# Altium PCB 0.PCB1.PcbDoc (part 9 of 10)
Units mil, origin at the board's own origin, x right, y up, seen from the top; angles counter-clockwise.
Board outline 3897.64 x 3897.64 mil, 6 copper layers (Top Layer, Layer 1, Layer 3, Layer 4, Layer 2, Bottom Layer), stack 60.567 mil thick; 715 components, 563 nets, 2530 pads, 1442 vias.
Unrouted connection lines stored in the file: 6.
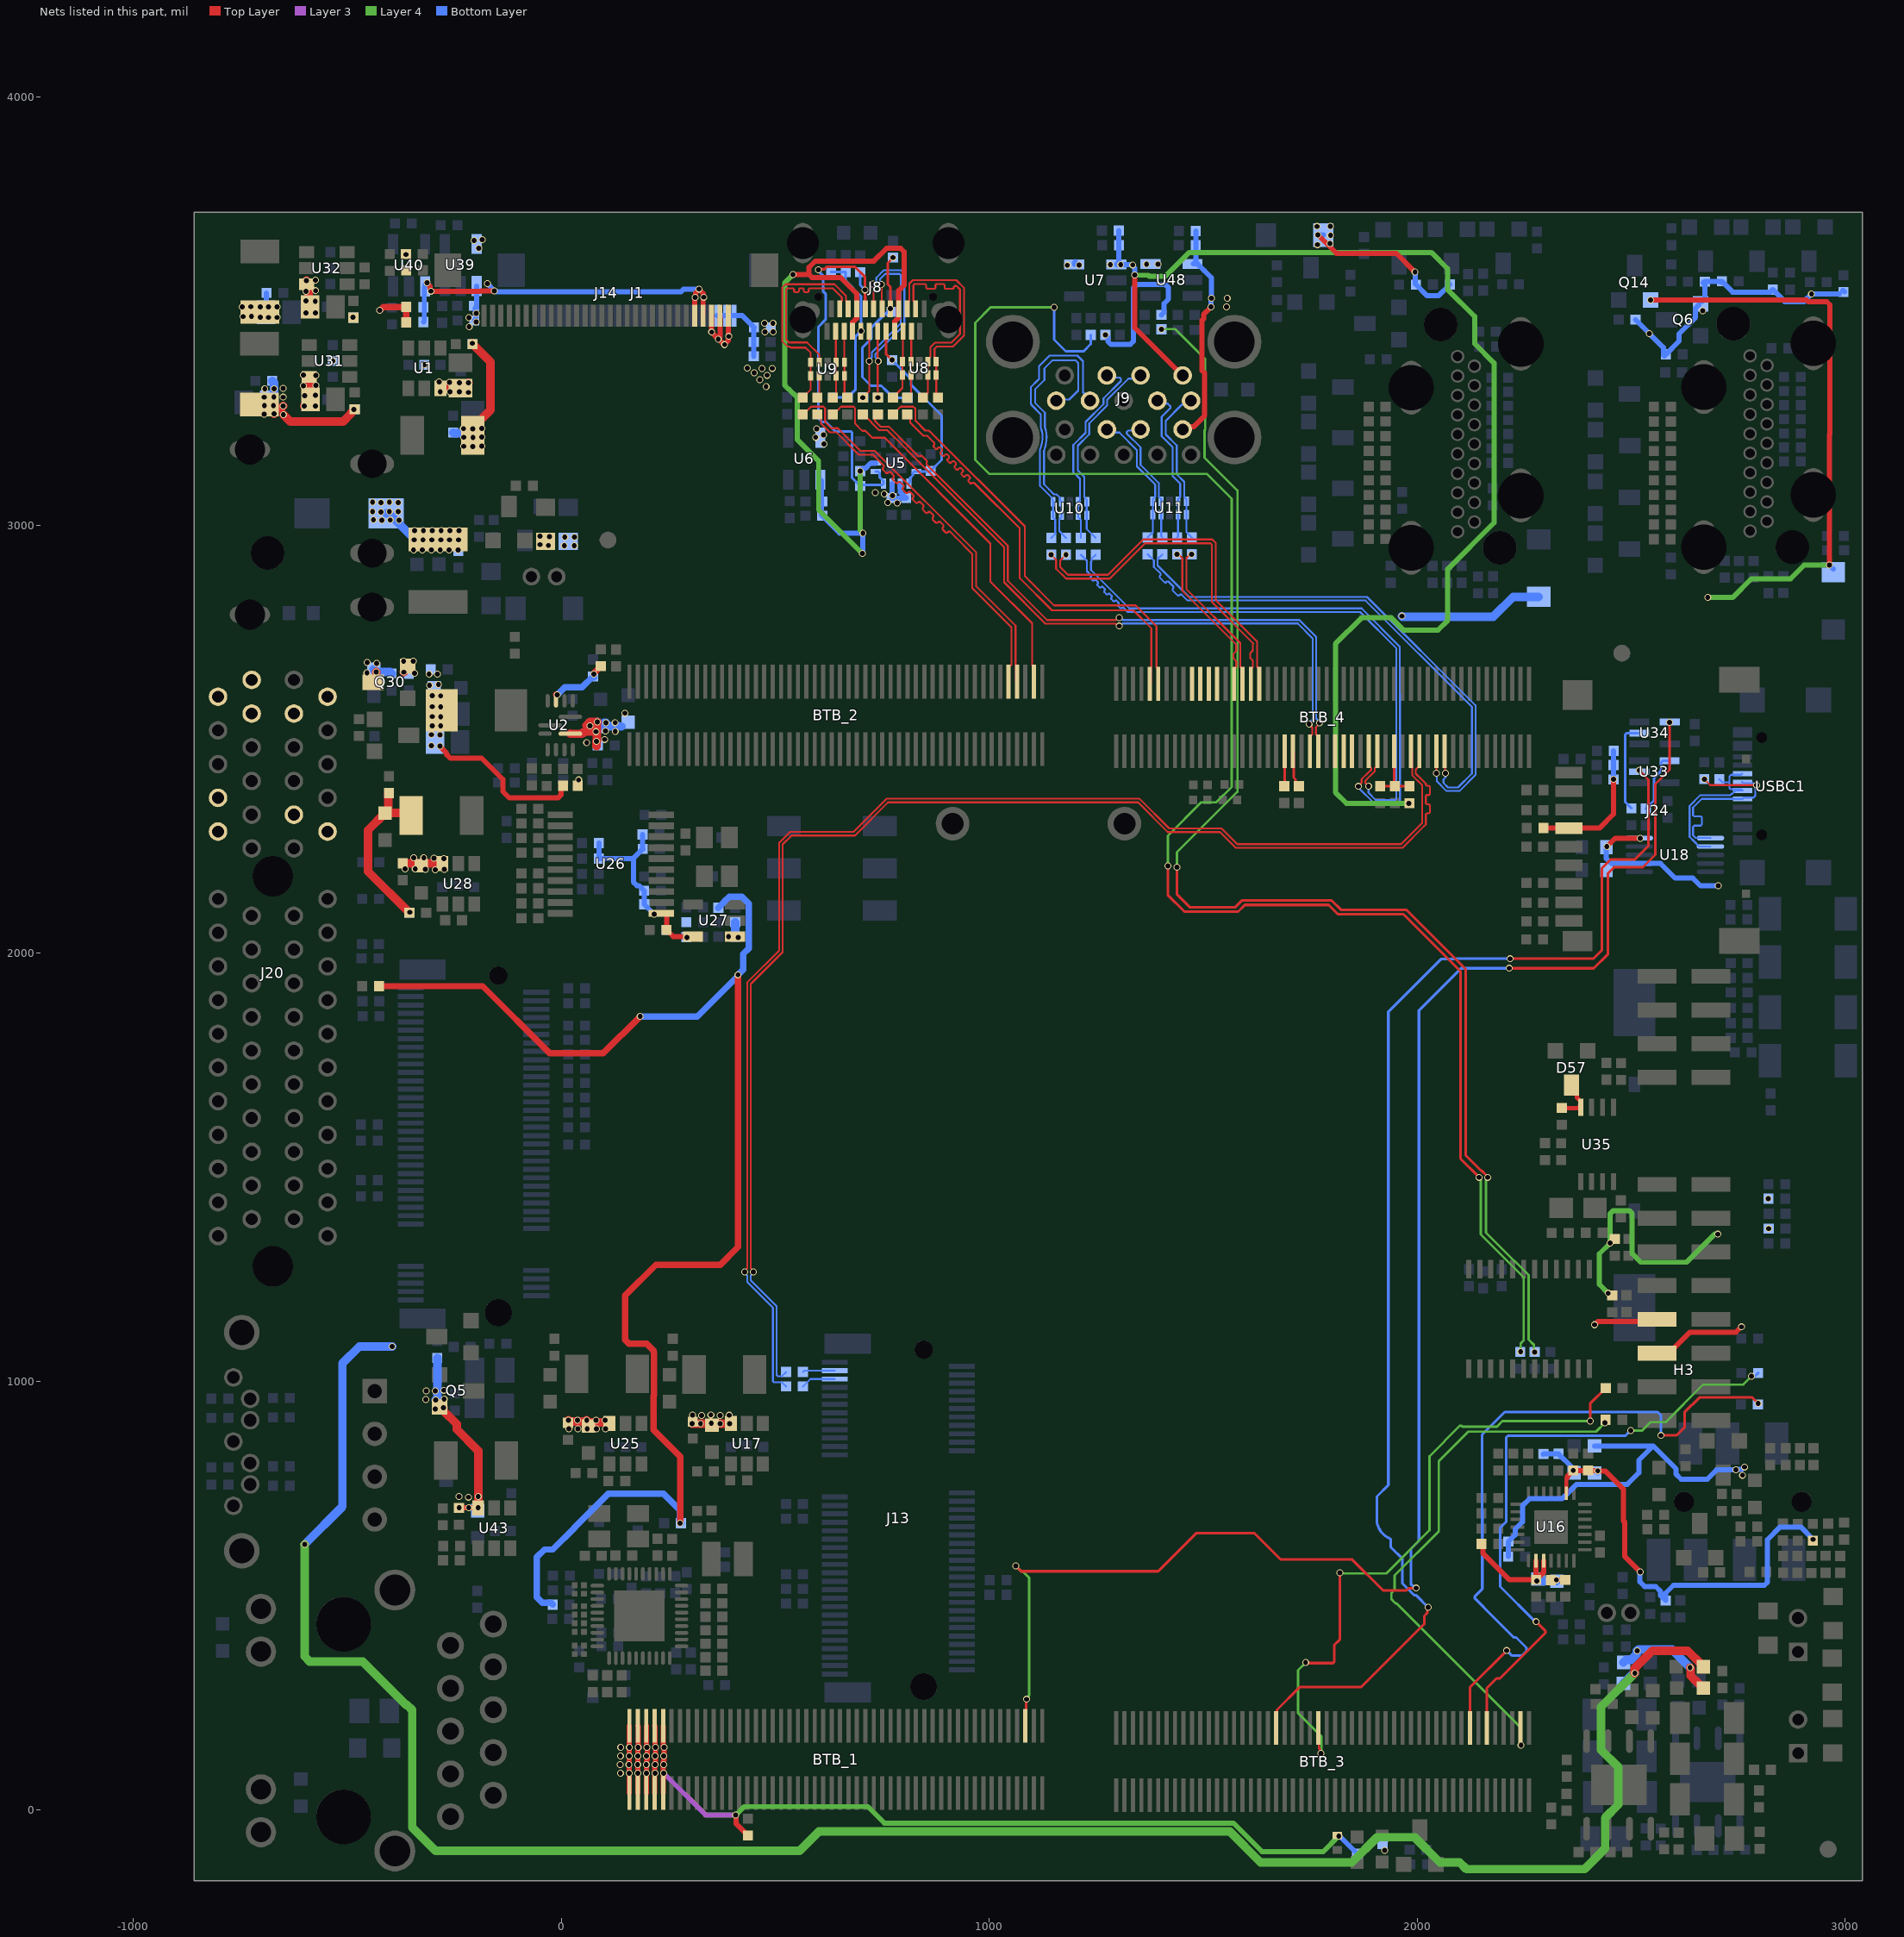
[diagram p12: the nets of this part, all layers, seen from the top]

## Via types
v1: diameter 16.14, hole 11.81, Top Layer to Bottom Layer, tented both sides, 1434 vias
v2: diameter 16.14, hole 11.81, Top Layer to Bottom Layer, 8 vias

## Nets (pads, with @x,y where several pads share a name; then routed paths per layer and width w, separated by ;. In a path a pad name is that pad's centre, name@x,y a point inside that pad or via, vN(x,y) a via of type N, cw(c..) or ccw(c..) an arc to the next point about the centre after c; other vN are vias at no path point) (continued)
TYPEC0_SSRX2P: BTB_2.49 R89.2 | length 893.8
  Top Layer w4.42: R89.2@634.57,3258.92 644.16,3268.51 645.71,3268.51 654.13,3276.93 682.87,3276.93 686.82,3272.98 686.82,3237.43 703.48,3220.77 710.6,3220.77 726.97,3204.4 755.92,3204.4 1002.9,2957.42 1002.9,2868.22 1100.25,2770.87 1100.25,2673.22 1104.37,2669.1 BTB_2.49@1104.37,2634.65
TYPEC0_SSTX1N: BTB_4.6 C80.2 | length 1056.1
  Top Layer w4.42: C80.2@775.1,3258.92 793.11,3276.93 822.77,3276.93 827.36,3272.34 827.36,3244.55 850.74,3221.16 859.51,3221.16 1083.22,2997.45 1083.22,2881.2 1151.5,2812.92 1341.96,2812.92 1390.76,2764.12 1390.76,2668.25 1394.91,2664.1 BTB_4.6@1394.91,2629.65
TYPEC0_SSTX1P: BTB_4.5 C79.2 | length 1062.1
  Top Layer w4.42: C79.2@808.4,3258.92 815.55,3251.77 815.55,3239.66 845.85,3209.35 854.62,3209.35 862.49,3201.49 872.12,3191.85 872.12,3188.19 870.45,3186.52 870.45,3183.29 875.3,3178.44 878.53,3178.44 882.1,3182.01 885.33,3182.01 890.18,3177.17 890.18,3173.94 886.6,3170.37 886.6,3167.14 891.45,3162.29 894.68,3162.29 898.25,3165.86 901.48,3165.86 906.33,3161.02 906.33,3157.79 902.75,3154.22 902.75,3150.99 907.6,3146.14 910.83,3146.14 914.4,3149.71 917.63,3149.71 922.48,3144.87 922.48,3141.64 918.91,3138.07 918.91,3134.84 923.75,3129.99 926.98,3129.99 930.55,3133.56 933.78,3133.56 938.63,3128.72 938.63,3125.49 935.06,3121.92 935.06,3118.69 939.9,3113.84 943.13,3113.84 946.7,3117.41 949.93,3117.41 954.78,3112.57 954.78,3109.34 951.21,3105.76 951.21,3102.53 956.05,3097.69 959.28,3097.69 960.95,3099.36 964.61,3099.36 968.61,3095.36 1071.41,2992.56 1071.41,2876.31 1146.61,2801.11 1337.07,2801.11 1378.96,2759.23 1378.96,2669.4 1377.94,2668.39 1377.94,2632.36 BTB_4.5@1375.23,2629.65
TYPEC0_SSTX2N: BTB_2.47 C83.2 | length 914.2
  Top Layer w4.42: C83.2@564.3,3258.92 573.89,3268.51 575.51,3268.51 584.03,3277.03 612.77,3277.03 616.56,3273.24 616.56,3241.38 631.15,3226.79 646.5,3226.79 699.28,3174.01 732.59,3174.01 969.82,2936.78 969.82,2857.3 1061.52,2765.6 1061.52,2674.4 1062.29,2673.64 1062.29,2637.36 BTB_2.47@1065,2634.65
TYPEC0_SSTX2P: BTB_2.46 C82.2 | length 920.7
  Top Layer w4.42: C82.2@598.4,3259.02 607.14,3250.28 607.14,3237.48 627.24,3217.37 642.6,3217.37 695.38,3164.59 728.69,3164.59 740.64,3152.64 753.81,3139.47 753.81,3135.81 751.49,3133.48 751.49,3130 759.62,3121.87 763.1,3121.87 765.51,3124.28 769,3124.28 777.13,3116.16 777.13,3112.67 774.71,3110.26 774.71,3106.78 782.84,3098.65 786.32,3098.65 788.74,3101.06 792.22,3101.06 800.35,3092.94 800.35,3089.45 797.93,3087.04 797.93,3083.55 806.06,3075.43 809.54,3075.43 811.96,3077.84 815.44,3077.84 823.57,3069.71 823.57,3066.23 821.15,3063.82 821.15,3060.33 829.28,3052.21 832.76,3052.21 835.18,3054.62 838.66,3054.62 846.79,3046.49 846.79,3043.01 844.37,3040.59 844.37,3037.11 852.5,3028.98 855.99,3028.98 858.4,3031.4 861.88,3031.4 870.01,3023.27 870.01,3019.79 867.6,3017.37 867.6,3013.89 875.72,3005.76 879.21,3005.76 881.62,3008.18 885.1,3008.18 893.23,3000.05 893.23,2996.57 890.82,2994.15 890.82,2990.67 898.94,2982.54 902.43,2982.54 904.75,2984.87 908.42,2984.87 920.56,2972.73 960.4,2932.88 960.4,2853.4 1052.1,2761.7 1052.1,2674.4 1049.52,2671.81 1048.03,2671.81 1045.32,2669.1 BTB_2.46@1045.32,2634.65
TYPEC0_USB20_OTG_DM: BTB_4.77 R82.2 | length 1593.8
  Top Layer w4.4: R82.2@704.83,3258.92 714.43,3249.32 716.21,3249.32 725.01,3240.52 725.01,3239.62 742.61,3222.02 761.84,3222.02 800.57,3183.3 800.57,3183.25 813.85,3169.97 813.9,3169.97 1035.05,2948.82 1035.05,2866.57 1131.42,2770.2 1295.45,2770.2 1301,2764.65 v1(1303.9,2764.65) ; v1(1747.4,2535.8) 1747.4,2534.84 1754.89,2527.35 1754.89,2511.92 1752.31,2509.34 1751.97,2509.34 1749.24,2506.62 BTB_4.77@1749.24,2472.17
  Bottom Layer w4.4: v1(1303.9,2764.65) 1306.61,2764.65 1312.35,2770.39 1721.21,2770.39 1755.65,2735.95 1755.65,2547.23 1747.4,2538.98 v1(1747.4,2535.8)
TYPEC0_USB20_OTG_DP: BTB_4.76 R81.2 | length 1594.3
  Top Layer w4.4: R81.2@739.97,3258.92 733.41,3252.37 733.41,3243.1 746.09,3230.42 765.32,3230.42 808.97,3186.78 808.97,3186.73 817.33,3178.37 817.38,3178.37 820.32,3175.42 834.86,3160.89 838.5,3160.89 839.68,3162.07 842.71,3162.07 854.82,3149.96 854.82,3146.94 853.64,3145.76 853.64,3142.11 870.32,3125.42 1043.45,2952.3 1043.45,2870.05 1134.9,2778.6 1295.32,2778.6 1301.06,2784.34 v1(1303.77,2784.34) ; BTB_4.76@1768.93,2472.17 1768.93,2506.62 1766.21,2509.34 1765.86,2509.34 1763.29,2511.92 1763.29,2528.33 1771.54,2536.59 v1(1771.54,2538)
  Bottom Layer w4.4: v1(1303.77,2784.34) 1306.67,2784.34 1312.22,2778.79 1724.69,2778.79 1764.05,2739.43 1764.05,2548.67 1771.54,2541.18 v1(1771.54,2538)
TYPEC0_USB20_OTG_ID: BTB_4.79 R78.2 | length 87.5
  Top Layer w6.16: BTB_4.79@1709.87,2472.17 1711.72,2470.33 1711.72,2410.75 1715.71,2406.76 1715.71,2398.34 R78.2@1723.67,2390.38
TYPEC0_USB20_VBUSDET: BTB_4.80 R77.2 | length 81.8
  Top Layer w6.16: R77.2@1689.57,2390.66 1690.19,2391.28 BTB_4.80@1690.19,2472.17
TYPEC1_SBU1: BTB_4.72
TYPEC1_SBU2: BTB_4.73
TYPEC1_SSRX1N: BTB_4.18 R83.2 | length 814.7
  Top Layer w4.42: v1(1179.35,2931.38) 1165.8,2917.83 1165.8,2902.5 1183.78,2884.52 1277.8,2884.52 1360.38,2967.1 1521.41,2967.1 1529.52,2958.99 1529.52,2824.68 1626,2728.2 1626,2669.23 1631.13,2664.1 BTB_4.18@1631.13,2629.65
TYPEC1_SSRX1P: BTB_4.17 R84.2 | length 816.3
  Top Layer w4.42: v1(1144.85,2931.38) 1156.38,2919.85 1156.38,2898.6 1179.88,2875.1 1281.7,2875.1 1364.28,2957.68 1517.51,2957.68 1520.1,2955.09 1520.1,2820.78 1616.58,2724.3 ; BTB_4.17@1611.45,2629.65 BTB_4.17@1611.45,2664.1 ; BTB_4.17@1613.4,2666 1613.4,2666.05 1616.01,2668.66 1616.01,2669.91 ; 1615.9,2669.8 1616.01,2669.91 ; 1616.4,2724.2 1616.01,2723.81 1616.01,2707.49 1609.7,2701.18 1609.7,2690.12 1616.01,2683.81 1616.01,2669.91
TYPEC1_SSRX2N: BTB_4.13
TYPEC1_SSRX2P: BTB_4.12
TYPEC1_SSTX1N: BTB_4.15 C75.2 | length 369.7
  Top Layer w4.42: v1(1438.7,2932.4) 1441.87,2932.4 1451.18,2923.09 1451.18,2847.02 1577.21,2720.99 1577.21,2706.19 1570.9,2699.88 1570.9,2688.82 1577.21,2682.51 1577.21,2669.24 1572.08,2664.1 BTB_4.15@1572.08,2629.65
  Bottom Layer w4.42: v1(1438.7,2932.4) 1438.92,2932.4 C75.2@1439.05,2932.27
TYPEC1_SSTX1P: BTB_4.16 C76.2 | length 364.1
  Top Layer w4.42: v1(1473.08,2932.4) 1469.9,2932.4 1460.6,2923.09 1460.6,2850.92 1586.63,2724.89 1586.63,2669.24 1591.76,2664.1 BTB_4.16@1591.76,2629.65
TYPEC1_SSTX2N: BTB_4.10
TYPEC1_SSTX2P: BTB_4.11
TYPEC1_USB20_OTG_DM: BTB_4.70 R79.2 | length 1412
  Top Layer w4.4: v1(1862.7,2390) 1862.7,2390.89 1870.26,2398.45 1870.26,2406.79 1887.04,2423.56 1887.42,2423.56 1892.63,2428.78 1892.63,2432.43 1890.05,2435 1889.76,2435 1887.04,2437.72 BTB_4.70@1887.04,2472.17
  Bottom Layer w4.4: R79.2@1248.7,2931.25 1239.1,2921.65 1239.1,2915.7 1238.02,2914.63 1238.02,2895.18 1327.5,2805.7 1869.98,2805.7 1959.3,2716.38 1959.3,2606.21 1959.87,2605.63 1959.87,2356.85 1952.03,2349.01 1911.25,2349.01 1910.68,2349.59 1900.13,2349.59 1862.7,2387.02 v1(1862.7,2390)
TYPEC1_USB20_OTG_DP: BTB_4.69 R80.2 | length 1418.2
  Top Layer w4.4: v1(1886.3,2390.2) 1886.3,2391.01 1878.66,2398.65 1878.66,2403.31 1890.52,2415.16 1890.89,2415.16 1901.03,2425.3 1901.03,2432.38 1903.66,2435 1904,2435 1906.72,2437.72 BTB_4.69@1906.72,2472.17
  Bottom Layer w4.4: R80.2@1214.2,2931.25 1228.3,2917.15 1228.3,2898.4 1228.3,2893.02 1237.8,2883.52 1237.8,2879.87 1236.55,2878.61 1236.55,2876.19 1242.19,2870.55 1244.61,2870.55 1246.48,2872.42 1248.9,2872.42 1254.54,2866.78 1254.54,2864.36 1252.67,2862.49 1252.67,2860.07 1258.31,2854.43 1260.73,2854.43 1262.6,2856.3 1265.02,2856.3 1270.66,2850.66 1270.66,2848.24 1268.79,2846.37 1268.79,2843.95 1274.43,2838.31 1276.85,2838.31 1278.72,2840.18 1281.14,2840.18 1286.78,2834.54 1286.78,2832.12 1284.91,2830.25 1284.91,2827.83 1290.55,2822.18 1292.97,2822.18 1294.84,2824.06 1297.26,2824.06 1302.91,2818.41 1302.91,2816 1301.03,2814.12 1301.03,2811.71 1306.68,2806.06 1309.09,2806.06 1310.35,2807.32 1314,2807.32 1317.44,2803.88 1324.02,2797.3 1866.5,2797.3 1950.9,2712.9 1950.9,2360.56 1948.32,2357.99 1903.61,2357.99 1886.3,2375.3 v1(1886.3,2390.2)
TYPEC1_USB20_OTG_ID: BTB_4.74
TYPEC1_USB20_VBUSDET: BTB_4.67 C253.1 R149.1 R150.2 | length 150.2
  Top Layer w6.16: C253.1@1913.6,2390.28 R150.2@1981.9,2390.3 ; R149.1@1946.09,2390.67 BTB_4.67@1946.09,2472.17 ; R149.1@1947.7,2390.38 R149.1@1947.99,2390.67
TYPEC_CC1: C78.1 D10.2 J8.A5 U5.10 U5.11 | length 462.9
  Top Layer w6.16: J8.A5@759.21,3453.02 759.21,3399.89 v1(773.1,3386)
  Bottom Layer w6.16: v1(773.1,3386) 817.18,3341.92 817.18,3328.07 888.9,3256.35 888.9,3152.74 C78.1@863.06,3126.9 861.47,3125.32 U5.10@830.3,3125.32 824.39,3125.32 821.57,3122.49 821.57,3116.58 815.01,3110.03 815.01,3100.19 U5.11@812.19,3097.36
TYPEC_CC2: C77.1 D11.2 J8.B5 U5.1 U5.14 | length 924.4
  Top Layer w6.16: v1(600.8,3596.57) 602.44,3598.21 614.93,3598.21 620.84,3604.12 685.7,3604.12 710,3579.82 v1(710,3549.8) 710.2,3549.6 710.2,3505.97 J8.B5@710.39,3505.77
  Bottom Layer w6.16: v1(600.8,3596.57) 600.8,3593.93 611.72,3583.01 611.72,3546.88 617.86,3540.74 617.86,3480.16 601.14,3463.44 601.14,3249.46 609,3241.6 618.28,3241.6 640.34,3219.54 676.27,3219.54 679.88,3215.93 679.88,3110.38 C77.1@698.76,3091.5 701.59,3094.33 750.31,3094.33 753.13,3097.15 753.13,3103.27 743.75,3112.65 743.75,3122.49 740.93,3125.32 U5.1@735.02,3125.32 ; D11.2@698.7,3591.12 698.7,3561.1 v1(710,3549.8)
TYPEC_DM: D9.2 J8.A7 J8.B7 R82.1 | length 518.9
  Top Layer w4.4: v1(704.83,3298.28) 719.9,3313.35 v1(719.9,3383.15) 719.9,3452.96 J8.A7@719.84,3453.02 ; v1(747.91,3562.4) 748.83,3561.48 748.83,3506.7 J8.B7@749.76,3505.77
  Bottom Layer w4.4: v1(719.9,3383.15) 719.9,3385.72 725.78,3391.6 725.78,3403.76 793.5,3471.48 793.5,3584.62 790.92,3587.19 757.17,3587.19 744.84,3574.87 744.84,3570.95 745.66,3570.13 745.66,3564.65 v1(747.91,3562.4)
TYPEC_DP: D8.2 J8.A6 J8.B6 R81.1 | length 542
  Top Layer w4.4: v1(728.25,3563.37) 729.89,3561.73 729.89,3505.96 J8.B6@730.08,3505.77 ; v1@739.52,3384.53 J8.A6@739.52,3453.02 ; v1(739.97,3298.28) 739.97,3315.6 739.52,3316.04 739.52,3382.59 v1(740.5,3383.57)
  Bottom Layer w4.4: v1(728.25,3563.37) 728.25,3563.55 736.44,3571.75 736.44,3578.35 753.69,3595.59 794.4,3595.59 801.9,3588.09 801.9,3468 734.18,3400.28 734.18,3392.02 740.5,3385.7 v1(740.5,3383.57)
TYPEC_SSRXN1: J8.B10 R86.1 U8.5 U8.6 | length 509.8
  Top Layer w4.42: J8.B10@808.42,3505.77 808.42,3519.55 813.52,3524.66 813.52,3564.59 821.63,3572.7 923.02,3572.7 941.1,3554.62 941.1,3442.84 915.54,3417.28 877.53,3417.28 872.33,3412.08 872.33,3393.6 872.54,3393.39 872.54,3386.09 U8.6@876.24,3382.4 U8.5@876.24,3350.9 876.24,3302.54 R86.1@880.5,3298.28
TYPEC_SSRXN2: J8.A10 R91.1 U9.5 U9.6 | length 158.3
  Top Layer w4.42: J8.A10@661.18,3453.02 661.54,3452.66 661.54,3380.86 U9.6@661.9,3380.5 U9.5@661.9,3349 661.9,3306.08 R91.1@669.7,3298.28
TYPEC_SSRXP1: J8.B11 R85.1 U8.4 U8.7 | length 510.3
  Top Layer w4.42: J8.B11@828.11,3505.77 828.11,3519.55 822.94,3524.72 822.94,3560.69 825.53,3563.28 826.72,3563.28 850.35,3563.28 852.94,3560.69 852.94,3554.32 855.08,3552.18 872.22,3552.18 874.36,3554.32 874.36,3561.14 876.5,3563.28 893.64,3563.28 895.78,3561.14 895.78,3554.32 897.92,3552.18 915.06,3552.18 917.2,3554.32 917.2,3556.36 919.79,3558.95 923.45,3558.95 929.08,3553.32 931.68,3550.72 931.68,3446.74 911.64,3426.7 873.63,3426.7 862.91,3415.98 862.91,3393.6 860.32,3391.01 860.25,3391.01 856.56,3387.32 U8.4@856.56,3350.9 856.56,3309.47 R85.1@845.37,3298.28
TYPEC_SSRXP2: J8.A11 R89.1 U9.4 U9.7 | length 158.2
  Top Layer w4.42: R89.1@634.57,3298.28 642.22,3305.93 U9.4@642.22,3349 U9.7@642.22,3380.5 641.86,3380.86 641.86,3452.65 J8.A11@641.49,3453.02
TYPEC_SSTXN1: C80.1 J8.A3 U8.1 U8.10 | length 164.6
  Top Layer w4.42: C80.1@775.1,3298.28 797.5,3320.68 U8.1@797.5,3350.9 U8.10@797.5,3382.4 798.24,3383.14 798.24,3452.28 J8.A3@798.97,3453.02
TYPEC_SSTXN2: C83.1 J8.B3 U9.1 U9.10 | length 511.7
  Top Layer w4.42: C83.1@564.3,3298.28 583.16,3317.14 U9.1@583.16,3349 U9.10@583.16,3380.5 583.16,3402.74 570.9,3415 536.4,3415 534.03,3417.37 528.73,3417.37 516.18,3429.92 516.18,3554.91 524.29,3563.02 638.47,3563.02 665.49,3535.99 665.49,3524.69 670.63,3519.55 J8.B3@670.63,3505.77
TYPEC_SSTXP1: C79.1 J8.A2 U8.2 U8.9 | length 158.2
  Top Layer w4.42: C79.1@810.23,3298.28 817.18,3305.23 U8.2@817.18,3350.9 U8.9@817.18,3382.4 817.92,3383.14 817.92,3452.28 J8.A2@818.66,3453.02
TYPEC_SSTXP2: C82.1 J8.B2 U9.2 U9.9 | length 505.6
  Top Layer w4.42: C82.1@599.43,3298.28 602.84,3301.69 U9.2@602.84,3349 U9.9@602.84,3380.5 602.84,3398.56 574.5,3426.9 536.4,3426.9 536.29,3426.79 532.63,3426.79 525.6,3433.82 525.6,3551.01 527.92,3553.33 528.19,3553.6 541.55,3553.6 544.14,3551.01 544.14,3546.66 546.42,3544.37 553.28,3544.37 555.56,3546.66 555.56,3551.32 557.84,3553.6 564.7,3553.6 566.98,3551.32 566.98,3546.66 569.26,3544.37 576.12,3544.37 578.4,3546.66 578.4,3551.01 580.99,3553.6 604.5,3553.6 634.56,3553.6 656.07,3532.09 656.07,3524.69 650.94,3519.55 J8.B2@650.94,3505.77
TYPEC_SUB1: C84.1 D12.2 J8.A8 R92.1 R97.1 | length 391.5
  Top Layer w6.16: J8.A8@700.15,3453.02 700.64,3453.5 v1(700.8,3453.5)
  Bottom Layer w6.16: D12.2@630.6,3592.1 631.08,3591.62 R97.1@664.8,3591.62 664.8,3571.4 700.8,3535.4 v1(700.8,3453.5) 687.4,3440.1 687.4,3315.98 C84.1@669.7,3298.28 R92.1@634.57,3298.28
TYPEC_SUB2: C85.1 D13.2 J8.B8 R94.1 R98.1 | length 440.3
  Top Layer w6.16: v1(769.05,3505.77) 769.05,3556.92 763.05,3562.92 763.05,3612.99 775.2,3625.14 v1(775.2,3625.32)
  Bottom Layer w6.16: v1(769.05,3505.77) 724.4,3461.12 724.4,3435.5 703.7,3414.8 703.7,3346 723.79,3325.91 748.11,3325.91 758.6,3315.42 758.6,3315.1 C85.1@775.6,3298.1 809.58,3298.1 R94.1@809.9,3297.78
UART2_D+: D24.2 U18.1 USBC1.A6 USBC1.B6 | length 486.4
  Top Layer w4.4: v1(2671.16,2406.52) 2684.77,2392.91 v1(2793,2392.91)
  Bottom Layer w4.4: U18.1@2685.16,2269.21 2684.9,2269.47 2650.71,2269.47 2647.88,2272.3 2644.61,2275.57 2644.61,2295.9 2647.18,2298.48 2662.63,2298.48 2664.77,2300.62 2664.77,2317.74 2662.63,2319.88 2647.18,2319.88 2644.61,2322.46 2644.61,2325.9 2644.61,2340.54 2664.86,2360.79 USBC1.B6@2760.21,2360.79 ; USBC1.B6@2759.4,2360.82 2762.22,2363.64 2785.98,2363.64 2787.16,2364.82 2787.16,2365.42 2790.06,2368.32 2790.06,2392.22 2784.91,2397.36 2762.22,2397.36 USBC1.A6@2759.4,2400.19
UART2_D-: D25.2 U18.2 USBC1.A7 USBC1.B7 | length 387.9
  Bottom Layer w4.4: U18.2@2685.16,2249.52 2658.78,2249.52 2646.86,2261.44 2636.2,2272.09 2636.2,2344.02 2661.78,2369.6 2731.7,2369.6 2735,2372.9 2735.89,2372.9 2743.47,2380.48 USBC1.A7@2760.21,2380.48 ; D25.2@2705.96,2406.56 2713.04,2399.48 2729.68,2399.48 ; USBC1.A7@2759.4,2380.5 2756.57,2383.33 2732.05,2383.33 2729.68,2385.7 2729.68,2399.48 ; USBC1.B7@2759.4,2419.87 2756.57,2417.05 2733.47,2417.05 2729.68,2413.26 2729.68,2399.48
UART2_RX: R291.2 U34.2 | length 214.3
  Bottom Layer w6.16: R291.2@2500.66,2338.88 2485.86,2353.68 2485.86,2511 2489.47,2514.61 U34.2@2520.43,2514.61
UART2_RX_M0_DEBUG: BTB_1.48 U34.4 | length 3903.2
  Top Layer w6.16: v1(1062.2,569) 1074.7,556.5 1394.8,556.5 1484.3,646 1619,646 1680.5,584.5 1847.3,584.5 1920.3,511.5 1974.6,511.5 1980.22,517.12 1997.34,517.12 v1(1997.53,517.32) ; BTB_1.48@1086.1,221.5 1086.01,221.59 1086.01,256.21 v1(1087.34,257.54) ; v1(2215.2,1965.1) 2412.5,1965.1 2445.8,1998.4 2445.8,2186.9 2460,2201.1 2527,2201.1 2556.2,2230.3 2556.2,2395.4 2589.5,2428.7 v1(2589.5,2539.7)
  Layer 4 w6.16: v1(1062.2,569) 1074.93,556.27 1078.31,556.27 1093.78,540.79 1093.78,266.59 1087.34,260.14 v1(1087.34,257.54)
  Bottom Layer w6.16: v1(1997.53,517.32) 1994.83,517.32 1986.85,525.3 1985.3,525.3 1985.3,608.8 2004.1,627.6 2004.1,1866.4 2102.8,1965.1 v1(2215.2,1965.1) ; v1(2589.5,2539.7) 2589.96,2540.16 U34.4@2589.96,2540.32
UART2_TX: R290.2 U33.4 | length 143.5
  Bottom Layer w6.16: R290.2@2534.26,2338.28 2553.16,2357.18 2553.16,2409.22 2569.04,2425.1 2569.04,2444.9 2573.96,2449.82 U33.4@2589.46,2449.82
UART2_TX_M0_DEBUG: BTB_3.20 U33.2 | length 3026.2
  Top Layer w6.16: BTB_3.20@1670.5,200.5 1672.35,202.34 1672.35,232.65 1725.4,285.7 1751.4,285.7 ; 1751.4,286.5 1869.79,286.5 2016.8,433.51 2016.8,452.31 2023.47,458.98 2023.47,470.41 v1(2025.38,472.32) ; v1(2217,1987.3) 2411.5,1987.3 2431.2,2007 2431.2,2198.1 2452.4,2219.3 2508.8,2219.3 2540.3,2250.8 2540.3,2405.7 v1(2518.7,2427.3)
  Bottom Layer w6.16: v1(2025.38,472.32) 1996.72,500.98 1992.45,500.98 1965.7,527.73 1965.7,585.6 1940.3,611 1938.5,612.8 1938.5,630.97 1935.83,633.64 1933.17,634.74 1932.24,634.87 1931.23,635.55 1930.57,635.82 1930.07,636.32 1927.01,638.36 1924.88,639.26 1914.97,649.17 1914.97,649.95 1912.03,654.36 1911.53,654.86 1910.45,656.73 1910.45,657.46 1908.41,662.39 1907.89,662.91 1907.33,664.99 1907.33,665.7 1906.3,670.9 1905.74,671.45 1905.74,731.04 1932.63,757.93 1932.63,1863.33 2056.3,1987 2088.4,1987 ; 2088.4,1987.3 v1(2217,1987.3) ; U33.2@2518.6,2424.23 2518.6,2427.2 v1(2518.7,2427.3)
UART4_RX_M2: BTB_3.45 R197.1 | length 1420.4
  Top Layer w6.16: BTB_3.45@2162.63,211.97 2162.63,283.43 2185.7,306.5 2193.7,306.5 2299.35,412.15 2299.35,417.25 v1(2277.87,438.73)
  Layer 4 w5.61: v1(2498.7,885.5) 2525.7,885.5 2545,904.8 2580.2,904.8 2668,992.6 2761.84,992.6 v1(2781.19,1011.95)
  Bottom Layer w6.16: v1(2277.87,438.73) 2275.77,438.73 2193.84,520.66 2193.84,616.23 2194.14,616.53 2194.14,658.74 2208.3,672.9 2208.3,869.49 2211.91,873.1 2486.3,873.1 v1(2498.7,885.5) ; v1(2781.19,1011.95) 2788.83,1011.95 R197.1@2796.68,1019.8
UART4_TX_M2: BTB_3.43 R195.1 | length 1624
  Top Layer w6.16: BTB_3.43@2123.26,190.65 2123.26,285.39 v1(2209.19,371.31) ; v1@2210.95,369.55 v1@2215.3,373.9 ; v1(2569.7,873.7) 2605.8,873.7 2624.5,892.4 2624.5,927.8 2659.23,962.53 2782.77,962.53 v1(2796.5,948.8)
  Bottom Layer w6.16: v1(2209.19,371.31) 2209.74,371.31 2221.7,359.35 2244.14,359.35 2255.3,370.51 2255.3,377.91 2231.21,402 2225.5,402 2178.8,448.7 2134.65,492.85 2134.65,497.95 2152.05,515.35 2152.05,698.95 2151.63,699.37 2151.63,875.53 2204.7,928.6 2561.6,928.6 2569.7,920.5 v1(2569.7,873.7)
UART7_RX_M2: BTB_3.25 R198.2 | length 1503.7
  Top Layer w5.61: BTB_3.25@1768,179.1 1770.48,176.62 1770.48,142.87 1773.31,140.04 1773.31,133.12 v1(1775.32,131.1)
  Top Layer w6.16: v1(1739.28,343.18) 1740.46,342 1803.56,342 1805.9,344.34 1805.9,383.8 1819.6,397.5 v1(1819.6,552.8) ; v1(2404,907.1) 2404,947.88 R198.2@2440.52,984.4
  Layer 4 w4: v1(1819.6,552.8) 1820.2,552.2 v1@1820.2,551.4
  Layer 4 w5.61: v1(1739.28,343.18) 1739.28,342.89 1721.89,325.49 1721.89,225.31 1776.59,170.61 1776.59,132.37 v1(1775.32,131.1) ; v1@1820.2,551.4 1927.7,551.4 2028.6,652.3 2028.6,825.1 2099.58,896.08 2103.72,896.08 2105.6,894.2 2186.3,894.2 2199.2,907.1 v1(2404,907.1)
UART7_TX_M2: BTB_3.49 R196.2 | length 1269
  Top Layer w6.16: v1(2438.4,903.2) 2438.4,908.48 R196.2@2440.22,910.3
  Layer 4 w5.61: v1(2242.6,150.5) 2242.6,190.5 1951.7,481.4 1949.4,481.4 1939.6,491.2 1939.6,505.85 1947.4,513.65 1947.4,546.8 2050.5,649.9 2050.5,814 2119.3,882.8 2418,882.8 v1(2438.4,903.2)
USB20_DM1: J9.11 R88.1 U11.2 U11.9 | length 308.7
  Bottom Layer w4.4: J9.11@1347,3224.2 1344.15,3221.35 1325.05,3221.35 1321.57,3217.87 1321.57,3214.23 1353.63,3182.17 1353.63,3141.18 1396.18,3098.63 1396.18,3066.69 1401.82,3061.05 U11.2@1401.82,3056.13 U11.9@1401.82,3024.63 1401.82,2974.48 R88.1@1404.68,2971.63
USB20_DP1: J9.12 R90.1 U11.1 U11.10 | length 319.2
  Bottom Layer w4.4: J9.12@1274.82,3223.93 1282.27,3216.48 1304.32,3216.48 1345.23,3175.58 1345.23,3137.71 1387.78,3095.15 1387.78,3066.69 1382.14,3061.05 U11.1@1382.14,3056.13 U11.10@1382.14,3024.63 1382.14,2983.47 R90.1@1370.3,2971.63
USB20_HOST0_DM: BTB_4.62 R88.2 | length 1257.6
  Top Layer w4.4: BTB_4.62@2044.52,2472.17 2044.84,2471.85 2044.84,2421.04 v1(2045.16,2420.72)
  Bottom Layer w4.4: R88.2@1404.68,2932.27 1393.4,2920.99 1393.4,2906 1466.88,2832.52 1882.76,2832.52 2136.2,2579.08 2136.2,2416.72 2098.68,2379.2 2068.6,2379.2 2045.8,2402 2045.8,2420.08 v1(2045.16,2420.72)
USB20_HOST0_DP: BTB_4.61 R90.2 | length 1251.7
  Top Layer w4.4: BTB_4.61@2064.2,2472.17 2064.93,2471.45 2064.93,2421.44 v1(2065.65,2420.72)
  Bottom Layer w4.4: R90.2@1370.3,2932.27 1385,2917.57 1385,2910.51 1385,2902.52 1400.27,2887.25 1400.27,2883.61 1398.13,2881.46 1398.13,2878.44 1410.24,2866.33 1413.26,2866.33 1415.71,2868.78 1418.74,2868.78 1430.84,2856.68 1430.84,2853.65 1428.39,2851.2 1428.39,2848.17 1440.5,2836.07 1443.53,2836.07 1445.67,2838.21 1449.31,2838.21 1463.4,2824.12 1465.69,2824.12 1879.28,2824.12 2127.8,2575.6 2127.8,2420.2 2095.2,2387.6 2072.08,2387.6 2061.35,2398.33 2061.35,2406.27 2067.1,2412.02 2067.1,2419.27 v1(2065.65,2420.72)
USB20_HOST1_DM: BTB_4.65 R143.1 | length 3142.3
  Top Layer w4.4: v1(428.72,1255.8) 428.72,1258.36 434.61,1264.25 434.61,1931.71 509.22,2006.32 509.22,2257.92 535,2283.7 682.92,2283.7 760.22,2361 1351.4,2361 1420.7,2291.7 1543,2291.7 1579.8,2254.9 1962.1,2254.9 2011.71,2304.51 2011.71,2392.85 1988.19,2416.38 1988.19,2469.45 BTB_4.65@1985.46,2472.17
  Bottom Layer w4.4: v1(428.72,1255.8) 428.72,1253.24 434.61,1247.35 434.61,1232.6 494.9,1172.31 494.9,1000.33 497.48,997.75 516.01,997.75 R143.1@525.61,988.15
USB20_HOST1_DM_R: J13.5 R143.2 | length 81.4
  Bottom Layer w4.4: R143.2@564.97,988.15 582.35,1005.53 J13.5@639.2,1005.53
USB20_HOST1_DP: BTB_4.64 R142.1 | length 3148.9
  Top Layer w4.4: v1(448.9,1255.8) 448.9,1258.36 443.01,1264.25 443.01,1928.23 517.62,2002.84 517.62,2254.44 538.48,2275.3 686.4,2275.3 763.7,2352.6 1347.92,2352.6 1417.22,2283.3 1539.52,2283.3 1576.32,2246.5 1965.58,2246.5 2016.3,2297.22 2020.12,2301.04 2020.12,2324.47 2022.69,2327.05 2027.4,2327.05 2029.54,2329.19 2029.54,2346.31 2027.4,2348.45 2022.25,2348.45 2020.12,2350.59 2020.12,2367.71 2022.25,2369.85 2027.4,2369.85 2029.54,2371.99 2029.54,2389.11 2027.4,2391.25 2022.69,2391.25 2020.12,2393.83 2020.12,2396.33 2009.98,2406.46 1996.59,2419.86 1996.59,2429.16 2005.15,2437.72 BTB_4.64@2005.15,2472.17
  Bottom Layer w4.4: v1(448.9,1255.8) 448.9,1253.24 443.01,1247.35 443.01,1236.08 503.3,1175.79 503.3,1014.93 505.88,1012.35 516.01,1012.35 R142.1@525.61,1021.95
USB20_HOST1_DP_R: J13.3 R142.2 | length 75.6
  Bottom Layer w4.4: R142.2@564.97,1021.95 568.23,1025.21 J13.3@639.2,1025.21
USB20_HOST_PWR_EN: R39.2 R324.1 | length 3198.4
  Top Layer w6.16: v1(1439,2201.2) 1439,2137.1 1468.31,2107.79 1575.01,2107.79 1590.49,2123.26 1800.11,2123.26 1821.61,2101.76 1974.51,2101.76 2113.4,1962.87 2113.4,1527.84 2149.39,1491.85 2151.13,1491.85 2164.54,1478.44 v1(2164.54,1476.7)
  Layer 4 w5.61: v1(1402.68,3457.96) 1402.92,3458.2 1434.6,3458.2 1504.7,3388.1 1504.7,3223.4 1503.12,3221.82 1503.12,3157.88 1580.01,3080.99 1580.01,2377.41 1439,2236.4 v1(1439,2201.2) ; v1(2164.54,1476.7) 2160.7,1472.86 2160.7,1347.16 2226.78,1281.09 2228.09,1281.09 2260.6,1248.57 2260.6,1097.6 2273.01,1085.19 2273.01,1070.29 v1(2274.6,1068.7)
USB30_DM: J9.2 R79.1 U10.5 U10.6 | length 469.5
  Bottom Layer w4.4: R79.1@1248.7,2970.61 1227.96,2991.35 U10.6@1227.96,3023.33 U10.5@1227.96,3054.83 1227.96,3059.75 1222.38,3065.32 1222.38,3112.73 1207.1,3128.01 1207.1,3186.03 1233.7,3212.63 1233.7,3237.74 1275.4,3279.44 1275.4,3292.6 1325.28,3342.48 1346.18,3342.48 J9.2@1353.63,3349.93
USB30_DP: J9.3 R80.1 U10.4 U10.7 | length 468.2
  Bottom Layer w4.4: R80.1@1214.2,2970.61 1214.2,3012.49 1208.28,3018.41 U10.7@1208.28,3023.33 U10.4@1208.28,3054.83 1211.98,3058.53 1211.98,3108.42 1196.7,3123.7 1196.7,3187.51 1225.3,3216.11 1225.3,3241.21 1267,3282.91 1267,3296.08 1307.7,3336.78 1307.7,3342.14 1305.12,3344.72 1280.38,3344.72 J9.3@1277.8,3347.3 ; J9.3@1274.82,3341.61 J9.3@1274.82,3349.93
USB30_OTG_PWR_EN: R38.2 R96.1 | length 4088.9
  Top Layer w6.16: v1(1417.3,2203.9) 1417.3,2136.4 1456.07,2097.63 1581.83,2097.63 1597.3,2113.1 1793.3,2113.1 1814.8,2091.6 1967.7,2091.6 2101.4,1957.9 2101.4,1520.16 v1(2144.86,1476.7)
  Layer 4 w5.61: v1(1152,3508.8) 1151.9,3508.9 1003.2,3508.9 967.3,3473 967.3,3152.9 1000.1,3120.1 1507.9,3120.1 1566.3,3061.7 1566.3,2388.7 1530.4,2352.8 1495.2,2352.8 1417.3,2274.9 v1(1417.3,2203.9) ; v1(2144.86,1476.7) 2148.7,1472.86 2148.7,1343.5 2248.6,1243.6 2248.6,1095.8 2241.6,1088.8 v1(2241.6,1069.4)
  Bottom Layer w5.61: v1(1152,3508.8) 1152,3433.7 1179.2,3406.5 1220.7,3406.5 1237.43,3423.23 R96.1@1237.43,3444.75
  Bottom Layer w6.16: R38.2@2240.6,1068.78 2240.98,1068.78 v1(2241.6,1069.4)
USB30_RXN: J9.5 R83.1 U10.2 U10.9 | length 642.6
  Bottom Layer w4.42: J9.5@1172.6,3293.4 1172.7,3293.5 1187,3293.5 1208.34,3314.84 1208.34,3378.86 1201.7,3385.5 1148.2,3385.5 1129.1,3366.4 1129.1,3339.5 1107.7,3318.1 1107.7,3285.3 1130.05,3262.95 1130.05,3230.11 cw(c1055.52,3205.03) 1132.93,3191.2 cw(c1055.52,3205.03) 1128.22,3175.07 1128.22,3140.2 1128.22,3095.51 1140.23,3083.5 1147.81,3075.92 1151.87,3071.86 1157.7,3071.86 1165.2,3064.35 1165.2,3058.52 U10.2@1168.9,3054.83 U10.9@1168.9,3023.33 1168.9,3018.41 1163.8,3013.31 1163.8,2986.51 R83.1@1179.7,2970.61
USB30_RXP: J9.6 R84.1 U10.1 U10.10 | length 656
  Bottom Layer w4.42: R84.1@1145.2,2970.61 1154.38,2979.79 1154.38,3013.25 1149.22,3018.41 U10.10@1149.22,3023.33 U10.1@1149.22,3054.83 1146.96,3063.44 1118.8,3091.6 1118.8,3176.99 ccw(c1055.52,3205.03) 1120.63,3228.51 1120.63,3259.05 1098.28,3281.4 1098.28,3282.75 1097.1,3283.93 1097.1,3322.49 1113.54,3338.93 1113.73,3338.93 1116.77,3341.97 1116.77,3372.27 1140.9,3396.4 1206.21,3396.4 1219.24,3383.37 1219.24,3310.88 1235.52,3294.6 J9.6@1235.52,3290.83
USB30_TXN: C75.1 J9.8 U11.4 U11.7 | length 365
  Bottom Layer w4.42: J9.8@1399.7,3291.6 1407.43,3283.87 1417.13,3283.87 1423.57,3277.43 1423.57,3273.77 1403,3253.2 1403,3208.21 1428.6,3182.61 1428.6,3115.01 1446.36,3097.25 1446.36,3066.21 1441.2,3061.05 U11.4@1441.2,3056.13 U11.7@1441.2,3024.63 1441.2,2973.78 C75.1@1439.05,2971.63
USB30_TXP: C76.1 J9.9 U11.5 U11.6 | length 376.3
  Bottom Layer w4.42: J9.9@1471.72,3290.83 1461.2,3290.83 1451.82,3281.45 1449.95,3281.45 1412.42,3243.92 1412.42,3212.11 1438.02,3186.51 1438.02,3118.91 1455.78,3101.15 1455.78,3066.14 1460.88,3061.05 U11.5@1460.88,3056.13 U11.6@1460.88,3024.63 1460.88,2984.18 C76.1@1473.43,2971.63
VBUS5V0_TYPEC: C74.1 C87.1 C88.1 J8.A4 J8.A9 J8.B4 J8.B9 U5.2 U6.1 | length 1887.5
  Top Layer w12: v1(541.8,3585.9) 578.93,3585.9 579.3,3585.53 ; J8.A9@680.86,3453.02 680.86,3473.86 690.22,3483.22 690.22,3505.68 J8.B4@690.31,3505.77 690.22,3505.87 690.22,3541.28 653,3578.5 586.33,3578.5 579.3,3585.53 ; J8.A4@779.29,3453.02 779.38,3453.11 779.38,3476.37 788.64,3485.63 788.64,3505.68 J8.B9@788.74,3505.77 788.74,3548.04 801.31,3560.61 801.31,3638.69 793.4,3646.6 760,3646.6 730.6,3617.2 593.9,3617.2 579.3,3602.6 579.3,3585.53
  Layer 4 w12: v1(541.8,3585.9) 522.2,3566.3 522.2,3327 531.3,3317.9 532.2,3317.9 552.1,3298 552.1,3199.72 601.5,3150.32 601.5,3036 v1(703.4,2934.1) ; v1(698.76,3126.47) 698.76,2988.04 v1(705.1,2981.7)
  Bottom Layer w12: U6.1@605.4,3106.39 607.79,3104 607.79,3024.59 C87.1@610.18,3022.2 650.68,2981.7 v1(705.1,2981.7) 705.1,2935.8 v1(703.4,2934.1) ; v1(698.76,3126.47) 704.56,3132.27 710.11,3132.27 722.75,3144.91 734.93,3144.91 U5.2@735.02,3145
VCC3V3_PCIECLK: C162.1 C163.1 C168.1 C186.1 C187.1 R223.1 R224.1 R225.1 R226.1 R235.1 U26.1 U27.5 | length 453.1
  Top Layer w12: U26.1@234.03,2093.25 244.49,2093.25 246.36,2091.38 C162.1@246.36,2054.53 261.86,2039.03 U27.5@308.07,2039.03
  Bottom Layer w12: C168.1@88.06,2257.43 R235.1@88.06,2221.5 168.67,2221.5 ; R223.1@190.42,2277.53 190.66,2277.29 190.66,2243.97 R224.1@190.9,2243.73 168.67,2221.5 ; v1(217.38,2091.43) 217.31,2091.43 R226.1@194.3,2114.43 194.06,2114.67 194.06,2146.09 R225.1@193.82,2146.33 182.32,2157.83 177.56,2157.83 168.67,2166.73 168.67,2221.5
  other v1: 293.78,2036.93
VCC3V3_PCIEx4: C180.1 C193.1 C194.2 J20.A9 J20.A10 J20.B8 J20.B10 L17.2 R249.2 | length 402.8
  Top Layer w20: C193.1@-402.48,2374.32 -404.28,2372.52 -404.28,2334.9 C180.1@-411.48,2327.7 ; R249.2@-354.56,2094.8 -451.18,2191.42 -451.18,2288 C180.1@-411.48,2327.7 ; L17.2@-350.55,2322.4 -355.85,2327.7 C180.1@-411.48,2327.7
  other v1: -353.46,2096
VCC3V3_SD_S3: C9.1 C10.1 D23.1 J24.4 R285.2 | length 325.4
  Top Layer w12: D23.1@2295.06,2293.02 2295.28,2292.8 2354.51,2292.8 J24.4@2354.73,2292.58 2425.98,2292.58 2458.69,2325.29 v1(2458.69,2406.22)
  Bottom Layer w12: v1(2458.69,2406.22) 2458.84,2406.37 2458.84,2473.07 R285.2@2458.99,2473.22
VCC4V0_SYS: BTB_1.1 BTB_1.2 BTB_1.3 BTB_1.4 BTB_1.5 BTB_1.96 BTB_1.97 BTB_1.98 BTB_1.99 BTB_1.100 C20.2 C21.1 C22.1 C23.1 C24.1 C27.1 L3.2 R11.1 R12.1 R24.2 U2.5 U23.2 | length 3110.5
  Top Layer w12: v1(-283.2,2484.4) -283.2,2483.28 -267.49,2467.56 -267.49,2464.39 -259,2455.9 -185.9,2455.9 -136.14,2406.14 -136.14,2378.1 -120.99,2362.95 -7.35,2362.95 0.2,2370.5 0.2,2387.56 R12.1@4.2,2391.56 ; BTB_1.100@159.49,38.17 159.19,38.47 159.19,145.31 158.9,145.6 159.19,145.89 159.19,195.36 BTB_1.1@159.49,195.65 ; BTB_1.99@179.17,38.17 179.17,140.65 180.55,142.03 180.55,144.08 v1@181.34,144.87 ; BTB_1.2@179.17,195.65 180.25,194.57 180.25,148.07 182.3,146.02 v1@182.3,143.78 ; BTB_1.98@198.86,38.17 198.86,113.41 201.54,116.1 201.54,144.98 v1@201.02,145.51 ; v1@198.86,145.51 BTB_1.3@198.86,195.65 ; BTB_1.97@218.54,38.17 218.54,106.68 220.7,108.84 220.7,145.1 219.91,145.89 219.91,153.59 219.62,153.87 219.62,194.57 BTB_1.4@218.54,195.65 ; BTB_1.96@238.23,38.17 238.23,113.25 240.38,115.41 v1@240.38,145.32 ; v1@238.23,145.32 BTB_1.5@238.23,195.65 ; v1(407.94,-13) 408.4,-13.46 408.4,-32.68 R24.2@436.6,-60.88
  Top Layer w15: U2.5@-11.93,2604.18 v1(-9.24,2604.18) ; v1(76.62,2652.57) 76.84,2652.79 76.84,2654.86 91.35,2669.37 C20.2@93.62,2669.37
  Layer 3 w12: v1(239.56,84.8) 337.36,-13 v1(407.94,-13)
  Layer 4 w12: v1(407.94,-13) 427.64,6.7 716.7,6.7 755,-31.6 1570.6,-31.6 1637.4,-98.4 1780.5,-98.4 v1(1816.9,-62)
  Bottom Layer w12: v1(1816.9,-62) 1818.34,-62 R11.1@1859.7,-103.36
  Bottom Layer w15: v1(-9.24,2604.18) -8.93,2604.18 8.3,2621.41 48.89,2621.41 C27.1@74.4,2646.92 76.5,2644.82 C27.1@76.5,2644.5
  other v1: 138.4,84.8 158.63,84.8 178.86,84.8 199.09,84.8 219.32,84.8 138.2,104.8 158.43,104.8 178.66,104.8 198.89,104.8 219.12,104.8 239.36,104.8 138.4,125.2 158.63,125.2 178.86,125.2 199.09,125.2 219.32,125.2 239.56,125.2 139.23,144.87 159.46,144.87 179.69,144.87 199.92,144.87 220.15,144.87 240.38,144.87 -302.9,2485 -283.2,2510.3 -302.9,2510.9 -281.6,2531.2 -301.3,2531.8 -301.3,2553.1 -281.6,2552.5 -301.3,2576.2 -281.6,2575.6 -301.3,2602.1 -281.6,2601.5 -307.6,2626.2 -286.6,2628.2 -308.59,2652.06 -288.91,2652.3
VCC5V0_USB20_HOST: C285.1 C286.1 J9.10 U48.1 | length 533.3
  Top Layer w12: J9.10@1452.02,3223.93 1458.01,3229.92 1477.67,3229.92 1503.38,3255.62 1503.38,3355.54 1497.4,3361.51 1497.4,3478.53 1500.97,3482.1 1500.97,3492.15 1518.07,3509.24 v1(1518.07,3510.36)
  Bottom Layer w12: C286.1@1482.78,3687.43 1482.78,3654.03 1482.78,3616.13 1476.98,3610.33 1486.81,3610.33 1502.42,3594.73 1502.76,3594.73 1518.9,3578.59 v1(1518.9,3530.03) ; v1(1518.07,3510.36) 1518.48,3510.78 1518.48,3529.75 v1@1518.2,3530.03
  other v1: 1554.25,3510.43 1556.1,3530.03
VCC5V0_USB30_OTG: C90.1 C91.1 J9.1 R150.1 U7.1 | length 2946.5
  Top Layer w12: v1(1340.3,3584.53) 1340.3,3460.83 1451.2,3349.93 J9.1@1452.02,3349.93 ; v1(1980.45,2350.55) 1981.51,2350.55 R150.1@1981.9,2350.94
  Layer 4 w12: v1@1340.53,3584.13 1371.81,3584.13 1374.59,3581.35 1411.35,3581.35 1467.43,3637.43 2032.97,3637.43 2070.7,3599.7 2070.7,3551.2 2134.4,3487.5 2134.4,3424 2179.6,3378.8 2179.6,3005.7 2071.4,2897.5 2071.4,2777.7 2048.87,2755.17 2039.63,2755.17 ; v1(1980.45,2350.55) 1834.55,2350.55 1809,2376.1 1809,2722.9 1869.8,2783.7 1939.6,2783.7 1968.1,2755.2 2039.6,2755.2
  Bottom Layer w12: C90.1@1302.78,3688.13 1302.78,3615 U7.1@1297.21,3609.43 1297.43,3609.22 1331.78,3609.22 1340.3,3600.7 v1(1340.3,3584.53)
  other v1: 1335.4,3608.2 1283.1,3608.6 1307.2,3608.8
VCC5V0_USB_S0: C7.2 C8.1 C11.1 C72.1 C73.1 L2.2 R4.2 U5.12 U5.13 U6.5 U7.5 U48.5 | length 415.3
  Top Layer w20: v1(-207.6,3425.1) -207.6,3423.92 -164.81,3381.13 -164.81,3269.19 -206.56,3227.44 L2.2@-206.56,3209.72
  Bottom Layer w12: C73.1@772.06,3063.4 C73.1@772.16,3063.5 ; C73.1@772.06,3069.4 772.72,3070.06 U5.13@772.82,3097.36 U5.13@772.82,3097.36 ; v1(773.9,3069.4) 772.72,3069.4 772.16,3068.84 C73.1@772.16,3063.5 ; U5.12@792.5,3097.36 792.6,3097.27 792.6,3076.96 C72.1@805.96,3063.6 805.86,3063.5 773.9,3063.5 C73.1@772.16,3063.5 ; U7.5@1198.79,3609.43 1198.79,3613.16 U7.5@1201.51,3615.88
  Bottom Layer w20: C11.1@-252.1,3216.62 -250.3,3214.82 -211.66,3214.82 C8.1@-206.56,3209.72
  other v1: 785.5,3052.2 763.04,3052.98 754.64,3073.48 733.9,3076.4 -206.2,3184 -227.9,3184.5 -185.1,3184.8 613.9,3190 -206.1,3205 -227.8,3205.5 -185,3205.8 594.5,3205.5 613.39,3211.02 -206.5,3225.3 596.63,3225.07 -228.2,3225.8 -185.4,3226.1 1182.5,3607.4 1209.8,3607.5 1367.7,3609.9 1394.7,3609.9
VCC12V_PCIEx4: C197.1 C198.1 J20.A2 J20.A3 J20.B1 J20.B2 J20.B3 Q30.3 | length 72.9
  Top Layer w20: Q30.3@-438.85,2633.35 -432.1,2640.1 v1(-432.1,2657.6)
  Bottom Layer w20: C197.1@-437.85,2663.35 v1(-432.1,2657.6) -400.1,2657.6 C198.1@-396.05,2653.55
  other v1: -453.8,2655.1 -430.8,2677.5 -452.9,2679.3
VCC_3V3_S0: C35.2 C36.2 C230.1 C231.1 C232.2 D49.2 H3.6 L15.1 L21.2 Q6.1 R6.2 R25.1 R26.1 R27.1 R28.1 R29.1 R30.1 R31.1 R32.1 R33.1 R34.1 R65.2 R128.1 R151.1 R153.1 R154.1 R157.1 R158.1 R170.1 R178.1 R179.1 R246.2 R272.2 R328.1 R382.2 R383.2 U18.7 U18.10 | length 7134
  Top Layer w12: v1(1768.1,3678.4) 1811.6,3634.9 1951.4,3634.9 v1(1994.9,3591.4) ; v1(2443.08,2249.38) 2462.43,2268.72 v1(2521.06,2268.72) ; v1(2446.22,1206) 2447.01,1205.21 2451.27,1205.21 R27.1@2455.6,1200.88 ; v1(2450.8,1323.3) 2452.42,1323.3 R28.1@2461.7,1332.58 ; H3.6@2560.51,1066.24 2588.27,1066.24 2637.23,1115.2 2744.58,1115.2 2756.78,1127.4 v1(2757.9,1127.4)
  Top Layer w15: R328.1@-425.42,1923.3 -183.3,1923.3 -26.4,1766.4 98.4,1766.4 v1(184.6,1852.6) ; v1(-423.7,3502.1) -415.8,3510 R26.1@-361.96,3510 -362.02,3509.94 -362.02,3474.48 R25.1@-362.9,3473.6 ; v1@278.6,671.1 278.6,824 215.8,886.8 215.8,966.3 217.06,967.56 217.06,1067.64 215.8,1068.9 215.8,1072 199.5,1088.3 158.19,1088.3 149.4,1097.09 149.4,1200.6 221.5,1272.7 371.8,1272.7 413.2,1314.1 v1(413.2,1949.9)
  Layer 4 w12: v1(2446.22,1206) 2425.4,1226.82 2425.4,1297.9 v1(2450.8,1323.3) 2450.8,1391.87 2457.83,1398.9 2495.27,1398.9 2502.3,1391.87 2502.3,1298.2 2522.1,1278.4 2629.4,1278.4 2694.9,1343.9 v1(2702.2,1343.9)
  Bottom Layer w12: C230.1@-689.04,3497.48 -688.51,3498 C230.1@-688.51,3510.09 ; C231.1@-688.51,3542.78 C230.1@-688.51,3510.09 ; v1(-683.39,3510.09) C230.1@-688.51,3510.09 ; v1(1271.4,3444.75) 1277.2,3438.95 1277.2,3429.53 1284.23,3422.5 1329.67,3422.5 1336.7,3429.53 1336.7,3554.23 1344.7,3562.23 1411.87,3562.23 1418.9,3555.2 1418.9,3528.3 1408.48,3517.88 1408.48,3497.13 R34.1@1402.68,3491.33 ; v1(1768.1,3678.4) 1768.46,3678.04 D49.2@1780.63,3678.04 ; v1(1994.9,3591.4) 1995.69,3590.61 1995.69,3563.55 2023.1,3536.14 2049.67,3536.14 R178.1@2075.98,3562.44 ; R29.1@2212.72,590.8 2212.87,590.95 2212.87,625.75 R30.1@2213.02,625.9 2229.1,641.98 2229.1,654.9 2246,671.8 2246,709.5 2262.2,725.7 2338.3,725.7 2372.4,759.8 2491,759.8 2517.7,786.5 2517.7,815.81 2551.24,849.36 ; L15.1@2414.34,849.36 2551.24,849.36 ; C36.2@2441.9,2248.32 2441.95,2248.27 2441.95,2221.32 2453.12,2210.15 U18.7@2519.02,2210.15 2568.15,2210.15 2602.2,2176.1 2643.6,2176.1 2661.8,2157.9 v1(2703.2,2157.9) ; R170.1@2509.98,3480.31 2575.02,3415.27 R151.1@2575.02,3399.21 ; U18.10@2519.02,2269.21 2520.57,2269.21 v1(2521.06,2268.72) ; R151.1@2577.1,3395.31 2575.02,3397.39 R151.1@2575.02,3399.21 ; R151.1@2578.2,3399.21 R151.1@2575.02,3399.21 ; R151.1@2580.82,3399.21 2611.76,3430.15 2611.76,3447.17 2650.2,3485.61 2650.2,3507.21 Q6.1@2658.5,3515.51 ; Q6.1@2662.1,3523.11 2665.68,3523.11 2671.98,3529.41 R158.1@2671.98,3569.11 2672.43,3569.56 2708.05,3569.56 R157.1@2710.4,3567.21 ; R158.1@2667.97,3566.88 R158.1@2669.8,3568.71 ; R157.1@2711.72,3570.01 2737.02,3544.71 2817.77,3544.71 2824.8,3544.73 R153.1@2830.6,3550.53 2858.72,3522.41 2903.5,3522.41 v1(2921.3,3540.21) R154.1@2986.8,3540.21 ; v1@2745.9,793.47 2699.73,793.47 2677.73,771.47 2616.72,771.47 2605.06,783.12 2605.06,795.54 2551.24,849.36 ; v1@2746.24,794.26 2758.52,794.26 2764.33,800.06 v1(2764.88,800.06) ; R154.1@2994.4,3548.09 2994.9,3548.59 R154.1@2997.9,3545.59
  Bottom Layer w15: R383.2@-19.78,478.6 -24.08,482.9 -43.7,482.9 -56.7,495.9 -56.7,589.5 -38.9,607.3 -19.9,607.3 30.35,657.55 30.35,658.18 109.87,737.7 239.21,737.7 277.18,699.72 277.18,689.72 277.62,689.28 277.62,671.08 R382.2@280,668.7 278.2,668.7 v1(277.8,669.1) ; v1(184.6,1852.6) 318,1852.6 v1@411.9,1946.5 ; R246.2@367.3,2106.43 382.21,2121.34 382.21,2121.84 392.67,2132.31 422.41,2132.31 438.2,2116.51 438.2,2011.7 425.3,1998.8 425.3,1962 v1(413.2,1949.9)
  other v1: 1923.8,-95.53 2760.17,780.95 2744.98,793.47 2821.14,1357 2820.44,1426.7 -319.6,3374.91 -533.61,3383.8 2542.5,3447.79 -683.39,3485.37 -703.07,3485.88 -663.71,3485.5 -486.41,3486.13 -743.2,3487.5 -723.52,3488.04 2666.9,3501.2 -745,3510.2 -703.07,3509.77 -663.71,3510.3 -725.2,3510.5 1767,3655.5 1796.4,3657.8 1797.55,3677.45 1766.03,3697.98 1796.8,3698.7
VCC_5V0_S0: C184.1 C185.1 C225.2 C226.1 C227.1 D26.2 D33.2 H3.8 L20.2 Q14.1 R36.2 R37.1 R127.1 R342.1 R348.1 U27.1 U39.5 | length 2471.4
  Top Layer w12: v1(2414.6,1132.4) 2421.92,1139.72 2555.25,1139.72 H3.8@2560.51,1144.98 ; v1(2545.6,3526.21) 2909.74,3526.21 2913.81,3522.14 2956.97,3522.14 2964,3515.11 2964,3212.97 2963.1,3212.07 v1(2963.1,2906.91)
  Top Layer w20: L20.2@-704.59,3282.13 -696.73,3282.13 L20.2@-693.64,3279.04 ; v1(-693.29,3279.38) L20.2@-693.64,3279.04 ; L20.2@-672.15,3279.05 -672.1,3279 L20.2@-672.1,3267.35 ; v1(-672.15,3279.74) -672.15,3276.55 -669.32,3273.71 -654.1,3273.71 v1(-649.54,3278.27) ; v1(-670.8,3260.1) -670.8,3264.57 -674.48,3268.25 -682.85,3268.25 L20.2@-693.64,3279.04 ; v1(-648.9,3258.6) -632.9,3242.6 -509.03,3242.6 -491.18,3260.44 -491.18,3261.75 C225.2@-482.19,3270.74 ; v1(2637.41,331.25) 2638.76,329.9 2638.76,312 2649.93,300.82 2651.03,300.82 R342.1@2662.21,289.65
  Layer 4 w12: v1(2678.76,2831.29) 2736.79,2831.29 2780.4,2874.9 2872.1,2874.9 2904.11,2906.91 v1(2963.1,2906.91)
  Bottom Layer w12: Q14.1@2545.5,3526.51 2545.6,3526.41 v1(2545.6,3526.21) ; v1(2963.1,2906.91) D26.2@2972.23,2897.78
  Bottom Layer w20: C226.1@-682.69,3286.9 -682.69,3287.95 v1(-671.24,3299.4) ; C226.1@-676.95,3293 -670.8,3299.14 v1@-670.8,3318.7 ; C227.1@-675.09,3337.2 -670.79,3332.9 v1(-670.79,3319.08) ; C184.1@406.66,2072.72 C185.1@406.66,2039.01 412.19,2039.01 v1(413.8,2037.4) ; v1(1964.6,2787.7) 1965.7,2786.6 2178.01,2786.6 2224.13,2832.72 D33.2@2283.7,2832.72 ; R348.1@2482.01,343.65 2487.76,349.4 2499.54,349.4 2513.41,363.27 2513.41,370.31 2516.5,373.4 2595.26,373.4 v1(2637.41,331.25)
  other v1: 2514.1,371 391.17,2039.4 30.7,2952.3 7.4,2952.5 8.5,2972.3 30.8,2972.7 -693.6,3259.7 -484.16,3270.2 -693.59,3299.07 -649.2,3299.2 -692.35,3319.12 -649.2,3319.6 478.8,3324.2 463.9,3339.8 481.2,3350.5 451.34,3356.2 468.8,3366.2 435.1,3367.4 493.1,3366.5 475.81,3451.87 495.5,3451.87 475.15,3471.63 494.84,3471.54 -192.3,3646.9 -203.59,3665.09 -184,3667
VCC_12V: C1.1 C2.1 C3.1 C12.1 C13.1 C17.1 C18.1 C19.1 C160.1 C161.1 C195.1 C196.1 C228.1 C229.1 C233.1 C234.1 C249.1 C250.1 C293.1 C294.1 D1.2 F1.2 Q5.2 Q30.2 R9.1 R131.1 R255.1 R319.1 R341.1 R347.1 U1.3 U2.1 U17.3 U25.3 U28.3 U31.3 U32.3 U43.3 | length 6403
  Top Layer w12: C294.1@-238.62,704.35 -238.39,704.58 -194.05,704.58 v1(-193.82,704.81)
  Top Layer w20: v1(-600.2,3278.5) -597.55,3278.5 -585.89,3290.15 C228.1@-585.89,3293.8 -587.31,3295.22 -587.31,3344.98 U31.3@-588.74,3346.4 ; v1(-596.26,3496.3) -596.26,3496.94 -586.21,3506.99 C233.1@-586.21,3510.18 -590.28,3514.25 -590.28,3559.49 -594.06,3563.27 U32.3@-594.35,3563.27 -594.35,3570.55 v1(-595.5,3571.7) ; C196.1@-369.98,2210.28 -369.51,2209.81 -278.25,2209.81 U28.3@-277.78,2209.34 ; v1(-367.7,2656.9) -366.85,2657.75 -366.85,2662.85 Q30.2@-358.85,2670.85 ; Q5.2@-284.32,940.7 -276.75,940.7 v1(-274.88,938.84) ; U1.3@-282.45,3320.27 -235.39,3320.27 C12.1@-234.9,3320.77 -228.99,3320.77 -216.66,3333.1 v1(-216.5,3333.1) ; Q5.2@-276.32,938.6 -276.32,932.7 -244.08,900.45 -244.08,888.38 -193.82,838.12 v1(-193.82,704.81) ; v1(16.67,909.2) 16.1,908.62 C161.1@16.1,903.18 19.7,906.78 C160.1@56.39,906.78 ; U2.1@21.5,2513.1 21.85,2512.75 48.63,2512.75 53.71,2517.83 v1(81.37,2517.83) 83.77,2517.83 83.81,2517.79 v1@83.81,2495.69 ; 59.09,2532.48 67.51,2540.91 84.59,2540.91 v1(84.74,2540.76) ; v1(59.72,909.2) 59.72,899.78 C160.1@63.5,896 C160.1@71.72,904.22 ; C160.1@64.6,904.22 U25.3@108.25,904.22 ; v1(82.14,2495.32) 82.78,2495.32 82.78,2484.04 82.93,2483.89 ; v1@83.81,2517.99 v1@83.81,2539.49 ; U25.3@107.75,904.22 111.56,900.41 U25.3@112.8,901.64 ; v1(305.85,901.62) 307.67,903.44 C250.1@307.67,905.78 ; C250.1@310.58,902.87 312.45,901 v1(325.53,901) C249.1@349.17,901 ; v1(350.7,902.2) 350.7,899.47 C249.1@352.27,897.9 355.37,901 392.81,901 U17.3@393.4,901.59 ; v1(393.4,901.4) 396.31,901.4 U17.3@396.5,901.59 ; v1(2508.41,318.35) 2508.21,318.55 2508.21,330.05 2548.82,370.66 2631.94,370.66 2662.76,339.84 2662.76,339.3 R341.1@2668.51,333.55
  Layer 4 w20: v1(-599.4,619.2) -599.4,357.52 -587.68,345.8 -463.6,345.8 -361.9,244.1 -359.62,244.1 -347.9,232.38 -347.9,-42.4 -293.6,-96.7 557.2,-96.7 602.3,-51.6 1562.32,-51.6 1634.12,-123.4 1847.6,-123.4 1906.3,-64.7 1994.1,-64.7 2053.2,-123.8 2099.4,-123.8 2114.9,-139.3 2390.9,-139.3 2439.1,-91.1 2439.1,-19.5 2469.7,11.1 2469.7,99.4 2429.8,139.3 2429.8,239.74 v1(2508.41,318.35)
  Bottom Layer w12: C293.1@-194.62,697.87 -194.62,704.01 v1(-193.82,704.81)
  Bottom Layer w20: v1(-599.4,619.2) -511.1,707.5 -511.1,1042.1 -471.5,1081.7 v1(-394.9,1081.7) ; D1.2@-408.89,3027.7 -402.98,3027.7 -352.53,2977.25 -342.75,2977.25 C1.1@-337,2971.5 -336.5,2971 C1.1@-336.5,2970.2 ; v1(-293.02,956.59) -288.72,960.89 R319.1@-288.72,1054.82 ; v1@-288.72,950.32 -277.24,938.84 v1(-274.88,938.84) ; v1(84.74,2540.76) 86.1,2539.4 86.1,2535.95 91.74,2530.31 91.95,2530.31 100.46,2538.82 v1(104.32,2538.82) ; C18.1@103.61,2530.1 135.06,2530.1 135.17,2529.99 C17.1@140.81,2529.99 ; R347.1@2481.91,292.55 2481.91,294.65 2501.16,313.9 2503.96,313.9 v1(2508.41,318.35)
  other v1: -238.27,704.7 -215.99,704.81 -216.67,729.63 -238.57,731.03 -193.87,731.03 17.7,889.5 39.22,889.5 60.75,889.5 82.27,889.5 103.8,889.5 371.2,901 38.2,909.2 81.25,909.2 102.77,909.2 306.81,921.29 328.32,920.7 371.38,920.7 392.89,921.08 349.8,921.86 -294.3,935.6 -315.9,957.5 -273.42,958.47 -315.4,978 -294.1,977.8 -273.8,979.3 -317.5,2196.2 -294,2195.5 -273,2196.2 -364.3,2197.3 -341,2197.4 -273.8,2221.4 -297.3,2222.1 -344.1,2223.2 -320.8,2223.3 40.71,2405.16 59.71,2492.09 101.36,2499.59 126.34,2517.99 103.92,2519.11 67.31,2531.61 126.14,2538.89 149.18,2561.1 -342.3,2654.2 -368.1,2682.1 -345.2,2682.3 -344.83,2941.9 -324.08,2941.9 -303.34,2941.9 -282.59,2941.9 -261.85,2941.9 -241.1,2941.9 -29.8,2952.8 -49.37,2954.95 -343.53,2965.8 -322.78,2965.8 -302.04,2965.8 -281.29,2965.8 -260.55,2965.8 -239.8,2965.8 -27.5,2973.6 -49.37,2974.63 -342.63,2987.7 -321.88,2987.7 -301.14,2987.7 -280.39,2987.7 -259.65,2987.7 -238.9,2987.7 -418.86,3011.41 -438.53,3012.38 -399.2,3012.3 -378.4,3011.7 -420.96,3031.21 -440.63,3032.18 -401.3,3032.1 -380.5,3031.5 -420.86,3052.81 -380.4,3053.1 -440.53,3053.78 -401.2,3053.7 -573.7,3278.8 -599.5,3303 -573.7,3303.4 -216.92,3310.35 -282.4,3311.8 -259.8,3311.6 -237.4,3311.6 -602.3,3325.7 -573.1,3326.6 -237.4,3333.2 -260.7,3334.2 -284.8,3334.6 -572.8,3349.7 -602.4,3350.7 -573.8,3496 -574.6,3523.2 -596.1,3524 -596,3546.1 -573.6,3547.9 -573.8,3572.8
VCC_RTC: C237.1 D57.3 U35.8 | length 108
  Top Layer w10: C237.1@2337.7,1638.68 2375.38,1638.68 U35.8@2380.1,1643.4 ; D57.3@2361.4,1695.5 2373.4,1683.5 2373.4,1662.61 2381.91,1654.09 U35.8@2381.91,1640.31
VCCA1V8_CODEC: C108.1 C114.1 C123.1 L4.2 L14.2 R121.1 U16.2 U16.3 | length 338.9
  Top Layer w12: R121.1@2149.95,620.45 2153.33,617.07 2153.33,598.77 2215.65,536.45 2276.31,536.45 v1(2279.16,533.6) ; U16.2@2277.54,581.18 2277.87,580.84 C114.1@2277.87,536.78 ; C114.1@2278.21,536.45 2295.25,553.49 U16.3@2295.25,581.18 ; v1(2325.31,536.34) 2345.7,536.34 C123.1@2345.81,536.23
  Bottom Layer w20: v1(2279.16,533.6) L14.2@2325.31,533.6
VCCA3V3_CODEC: C109.1 C110.1 C124.1 L5.2 L15.2 R112.2 R113.2 R125.1 U16.16 | length 1114.7
  Top Layer w10: U16.16@2348.4,738.66 2348.4,773.2 2349.77,774.57
  Top Layer w12: 2349.77,774.57 2351.21,776.01 2351.21,778.75 v1(2364.41,791.95) C110.1@2399.41,791.95 2399.91,791.45 2421.41,791.45 v1(2421.91,790.95) 2422.7,790.16 2439.97,790.16 2482.26,747.87 2482.26,674.22 2484.68,671.81 2484.68,591.55 v1(2520.91,555.32) ; R113.2@2924.31,628.04 2924.31,630.42 v1(2924.81,630.92)
  Bottom Layer w12: R112.2@2294.91,830.23 2295.11,830.43 2329.91,830.43 C124.1@2330.11,830.63 2360.96,799.78 2360.96,795.4 v1(2364.41,791.95) 2366.61,789.75 L5.2@2370.71,789.75 ; L15.2@2418.79,789.65 2420.61,789.65 v1(2421.91,790.95) L15.2@2421.91,786.52 ; v1(2520.91,555.32) 2520.11,554.53 2520.11,532.23 2520.01,532.12 2531.47,520.65 2557.34,520.65 2568.81,509.19 2568.81,499.94 R125.1@2580.47,488.27 2580.47,505.59 2598.76,523.89 2811.1,523.89 2818.4,531.19 2818.4,630.6 2847.7,659.9 2895.83,659.9 v1(2924.81,630.92)
VDD_CAM0_5V: C29.1 C30.1 J1.1 J1.2 J1.3 R37.2 | length 165.4
  Bottom Layer w12: J1.3@364.21,3489.66 J1.1@403.58,3489.66 422.96,3489.66 R37.2@450.52,3462.1 450.22,3461.8 450.22,3395 C29.1@449.92,3394.7
VDD_LCD0_3V3: C260.1 C261.1 J14.4 J14.5 R301.1 R303.1 U40.1 | length 898.7
  Top Layer w12: v1(-313.53,3566.4) -313.53,3565.28 -306.28,3558.03 -306.28,3552.31 -300.42,3546.45 -188.57,3546.45 -187.32,3547.7 v1(-156.5,3547.7) ; J14.5@311.98,3489.52 312.08,3489.62 312.08,3529.96 313.2,3531.08 v1(313.2,3532.2) 313.81,3532.81 313.81,3542.19 v1@322.3,3550.68 ; v1(322.3,3551.8) v1@322.3,3550.68 ; J14.4@331.66,3489.52 v1@331.66,3532.64 ; v1(332.88,3532.64) 332.09,3533.44 332.09,3540.89 v1@322.3,3550.68
  Bottom Layer w12: C261.1@-321.62,3475 -319.81,3476.81 -319.81,3509.3 U40.1@-319.81,3556.18 ; U40.1@-318,3557.99 -318,3561.93 v1(-313.53,3566.4) ; v1(-172,3564.4) -172,3563.8 -157.55,3549.35 v1@-157.55,3548.45 ; v1(-156.5,3547.7) -155.71,3546.91 -151.98,3546.91 -150.33,3545.25 63.31,3545.25 63.44,3545.13 279.69,3545.13 286.36,3551.8 v1(322.3,3551.8)
  other v1: -304,3546.8 -362.3,3632.4
VDD_LCD0_5V: C256.1 C257.1 J14.1 J14.2 J14.3 U39.1 | length 287.7
  Top Layer w12: J14.3@351.35,3489.52 351.45,3489.43 351.45,3451.55 v1(351.7,3451.3) 351.7,3450.18 361.05,3440.83 361.05,3440.75 v1(366.97,3434.83) ; v1@368.22,3434.7 368.22,3434.63 380.85,3422 v1(381.9,3422) ; v1@368.2,3436.5 371.03,3439.33 J14.2@371.03,3489.52 ; v1@380.9,3422.6 381.38,3422.6 390.72,3431.94 J14.1@390.72,3489.52
  Bottom Layer w12: C256.1@-202.92,3478.6 -198.92,3482.6 -198.92,3494.28 v1(-198.12,3495.07) ; v1@-200.13,3495.07 C257.1@-200.13,3508 ; C257.1@-197.33,3508 U39.1@-197.33,3558.67
  other v1: 391.52,3441.21 -214.97,3464.12 -198.7,3475.2 -215.78,3484.98
pads on no net: BTB_1.21 BTB_1.22 BTB_1.24 BTB_1.25 BTB_1.26 BTB_1.27 BTB_1.29 BTB_1.30 BTB_1.32 BTB_1.33 BTB_1.34 BTB_1.35 BTB_1.67 BTB_1.68 BTB_1.69 BTB_1.70 BTB_1.72 BTB_1.73 BTB_1.75 BTB_1.76 BTB_1.77 BTB_1.78 BTB_1.80 BTB_1.81 BTB_2.33 BTB_2.34 BTB_2.35 BTB_2.36 BTB_2.38 BTB_2.39 BTB_2.41 BTB_2.42 BTB_2.43 BTB_2.44 BTB_2.52 BTB_2.53 BTB_2.54 BTB_2.55 BTB_2.56 BTB_2.57 BTB_2.58 BTB_2.59 BTB_2.60 BTB_2.61 BTB_2.62 BTB_2.63 BTB_2.64 BTB_2.67 BTB_2.69 BTB_2.70 BTB_2.76 BTB_2.78 BTB_2.80 BTB_2.82 BTB_2.83 BTB_2.85 BTB_2.86 BTB_2.87 BTB_2.90 BTB_2.91 BTB_3.6 BTB_3.14 BTB_3.57 BTB_4.52 BTB_4.53 BTB_4.54 BTB_4.55 BTB_4.56 BTB_4.57 BTB_4.58 BTB_4.59 CR1.0 J1.13 J1.14 J5. J7. J8.@600.94,3533.73 J8.@868.66,3533.73 J9.14 J9.15 J9.17 J9.18 J11. J11.7 J11.8 J13. J13.6 J13.8 J13.9 J13.10 J13.11 J13.12 J13.13 J13.14 J13.15 J13.16 J13.17 J13.19 J13.20 J13.21 J13.22 J13.23 J13.32 J13.34 J13.36 J13.38 J13.40 J13.42 J13.44 J13.46 J13.48 J13.50 J13.54 J13.58 J13.59 J13.60 J13.61 J13.62 J13.64 J13.65 J13.66 J13.67 J13.68 J13.70 J13.71 J13.73 J14.14 J16. J17. J19. J19.5 J19.6 J19.7 J19.8 J19.11 J19.13 J19.17 J19.19 J19.20 J19.22 J19.23 J19.24 J19.25 J19.26 J19.28 J19.30 J19.32 J19.34 J19.36 J19.40 J19.42 J19.44 J19.46 J19.48 J19.56 J19.58 J19.67 J19.68 J19.69 J20. J20.A5 J20.A6 J20.A7 J20.A8 J20.A19 J20.A25 J20.A26 J20.A29 J20.A30 J20.A32 J20.B5 J20.B6 J20.B9 J20.B23 J20.B24 J20.B27 J20.B28 J20.B30 J24. MR1.Mark MR2.Mark MR3.Mark MR4.Mark MR5.Mark MR6.Mark U2.4 U4.1 U16.9 U16.25 U18.4 U18.5 U18.6 USBC1. USBC1.A4B9 USBC1.A5 USBC1.A8 USBC1.B4A9 USBC1.B5 USBC1.B8
copper on no net:
  other v2: 1259.09,161.13 2298.46,161.13 122.09,166.13 1161.46,166.13 1259.09,2600.13 2298.46,2600.13 122.09,2605.13 1161.46,2605.13

## Polygon pours and split planes (outlines as drawn)
GND on Bottom Layer "GND_L06_P090" (solid, remove dead copper, pour order 90): -857.1,-166.7 3040.6,-166.7 3040.6,3730.9 -857,3730.9